# Altium PCB gripper_control.PcbDoc
Units mm, origin at the board's own origin, x right, y up, seen from the top; angles counter-clockwise.
Board outline 58 x 55.88 mm, 2 copper layers (Top Layer, Bottom Layer), stack 1.58 mm thick; 23 components, 15 nets, 89 pads, 14 vias.
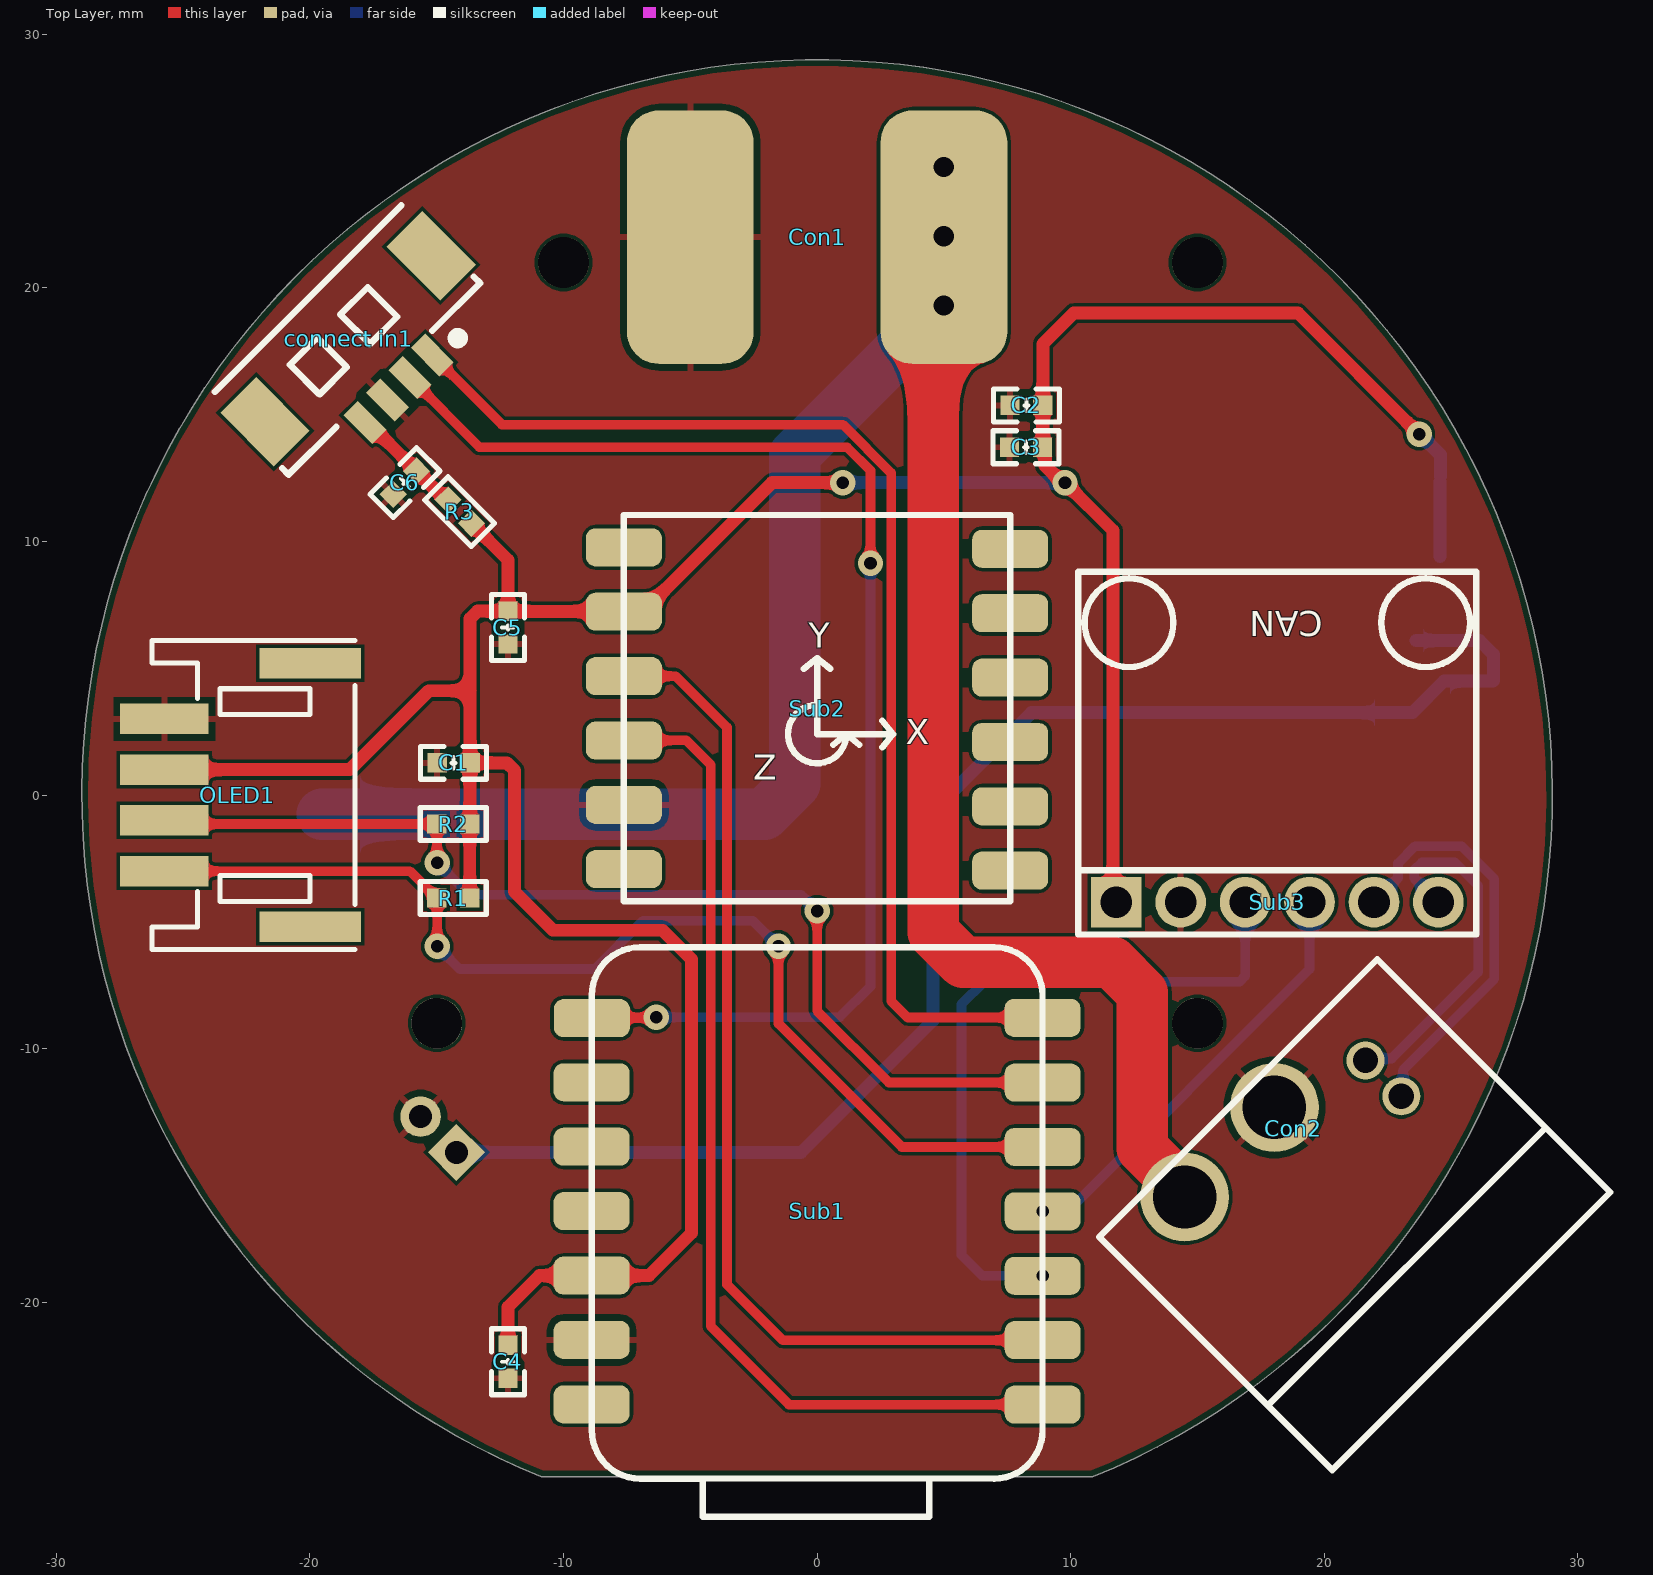
[diagram p0: Top Layer view]
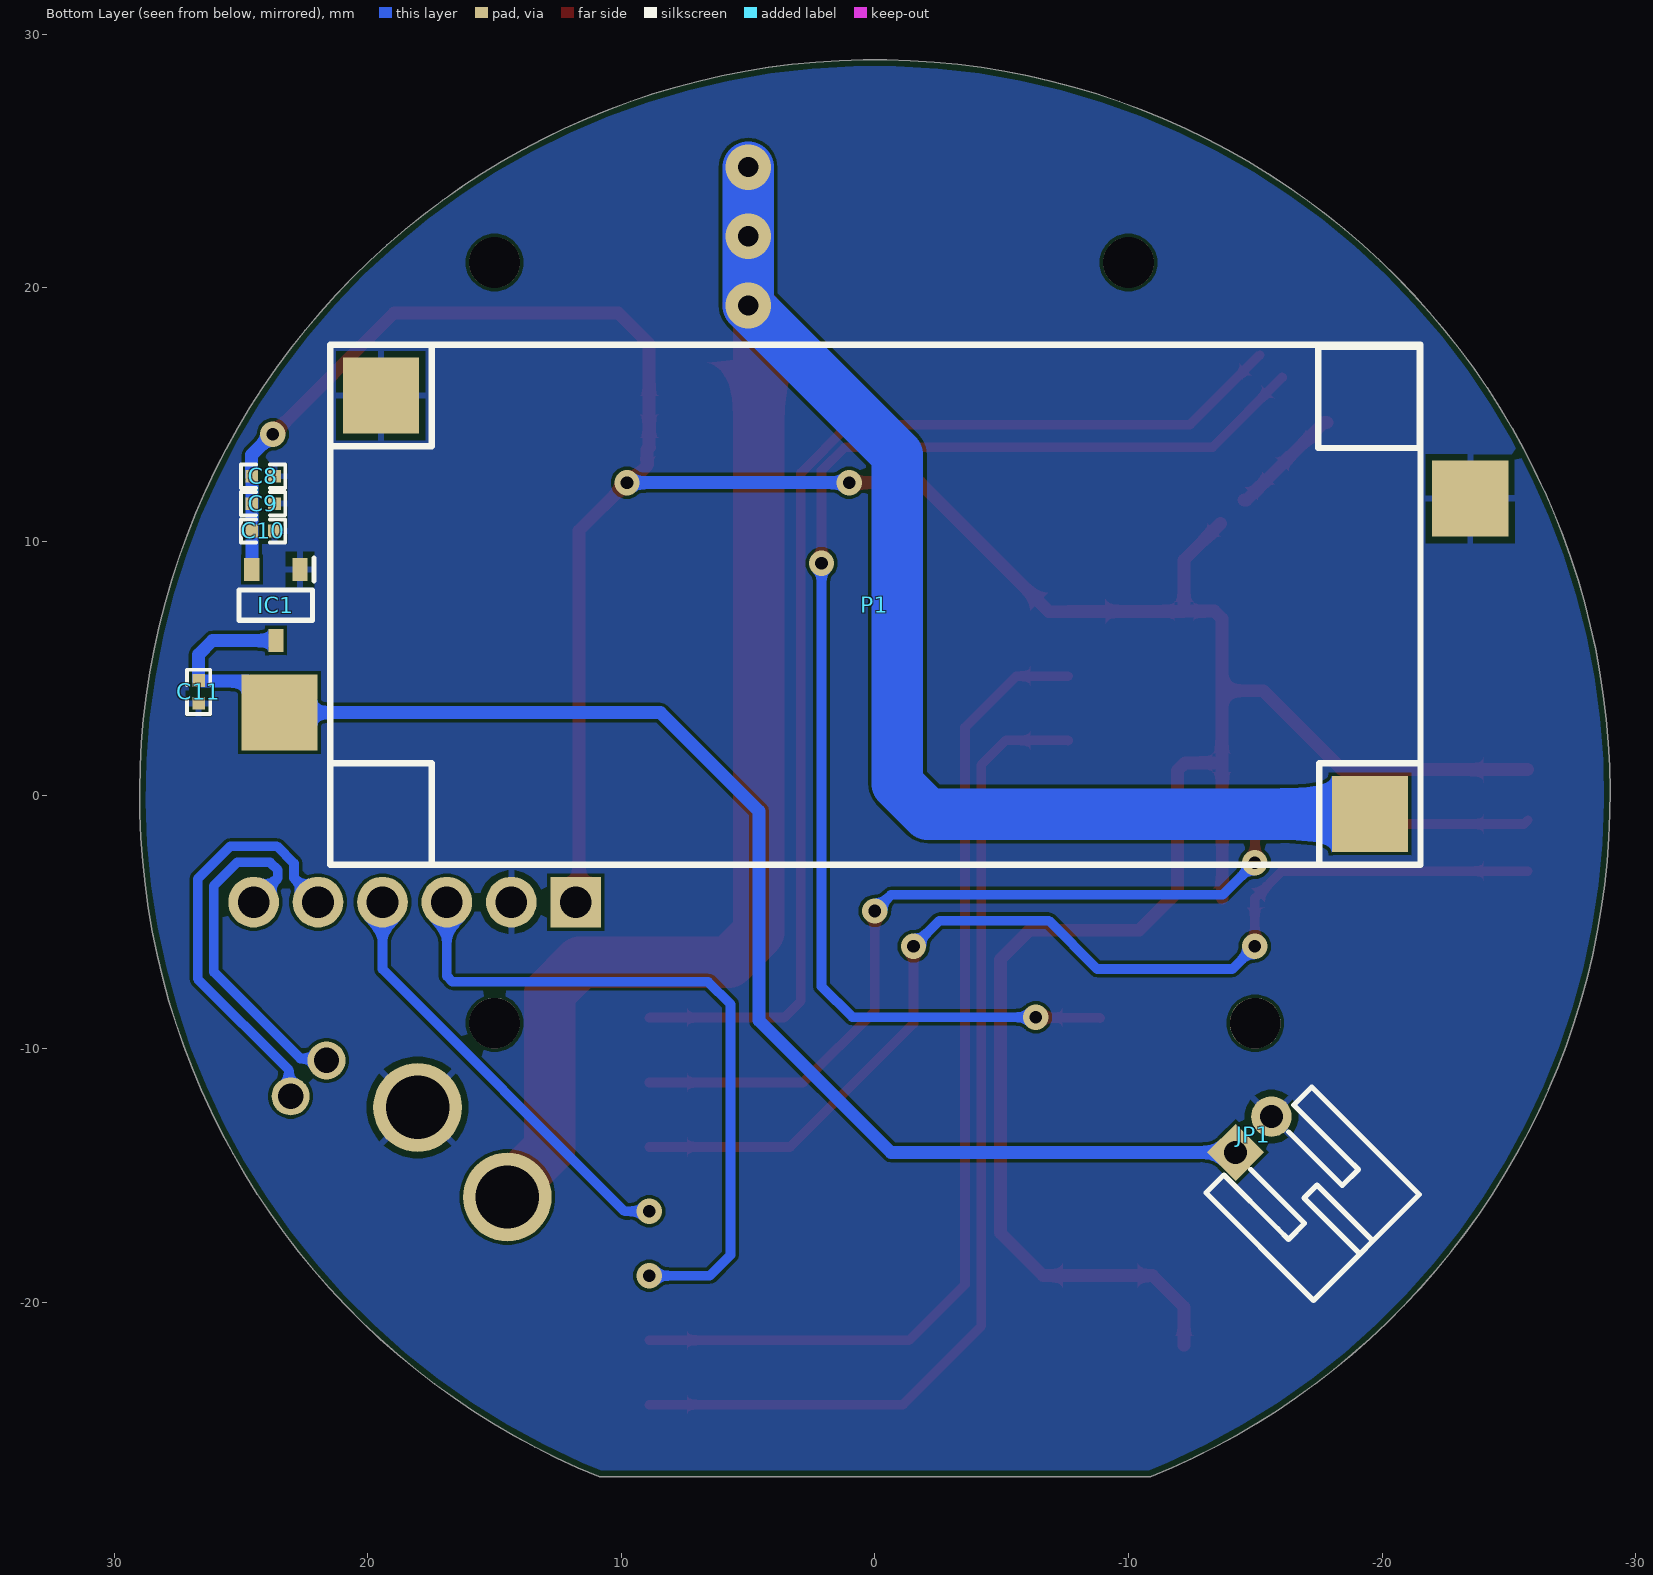
[diagram p1: Bottom Layer view, seen from below]

## Layer stack, top to bottom
Top Solder: solder mask 0.0102, Solder Resist, Dk 3.5
Top Layer: signal copper 0.0356
Dielectric 1: dielectric 1.5086, FR-4, Dk 4.8
Bottom Layer: signal copper 0.0356
Bottom Solder: solder mask 0.0102, Solder Resist, Dk 3.5

## Board outline
-10.864,-26.888 cw(c0,0) 10.864,-26.888

## Design rules (kind name [scope] priority, off if disabled: settings)
BoardOutlineClearance [All] p1: gap=0.254 ignorepadtopadclearanceinfootprint=FALSE except(0: Arc-SplitContinuation Track-SplitContinuation SMDPad-SplitContinuation THPad-SplitContinuation Via-SplitContinuation Fill-SplitContinuation Poly-SplitContinuation Region-SplitContinuation Text-SplitContinuation)
Clearance [All] p1: gap=0.127 ignorepadtopadclearanceinfootprint=FALSE
PolygonConnect [All] p1: connectstyle=Relief reliefconductorwidth=0.254 reliefentries=4 polygonreliefangle="90 Angle" airgapwidth=0.254
RoutingVias RoutingVias_1 [All] p1: holewidth=0.711 width=1.27 viastyle="Through Hole" minholewidth=0.1 minwidth=0.1 maxholewidth=5 maxwidth=5
RoutingVias [All] p2: holewidth=0.711 width=1.27 viastyle="Through Hole" minholewidth=0.711 minwidth=1.27 maxholewidth=0.711 maxwidth=1.27
SolderMaskExpansion [All] p1: expansion=0.102 istentingtop=FALSE
SupplyNets "Schematic Supply Nets_3" [InNet('5v')] p1: voltage=0.000
SupplyNets "Schematic Supply Nets_2" [InNet('GND')] p2: voltage=0.000
SupplyNets "Schematic Supply Nets_1" [InNet('24v')] p3: voltage=0.000
SupplyNets "Schematic Supply Nets" [InNet('3v3')] p4: voltage=0.000
Width [All] p1: maxlimit=2.032 minlimit=0.254 preferedwidth=0.254 minimp=50.000000 maximp=50.000000 favimp=50.000000
30 further rules are at their usual default settings.

## Components (designator, comment, footprint, x,y, rotation, side; value= is the part's Value field where it differs from the comment)
C1 "0.1uf" "C 0603_L" -14.336,1.27 r0 top
C2 "0.1uf" "C 0603_L" 8.255,15.367 r0 top
C3 "1uF" "C 0603_L" 8.24,13.716 r0 top
C4 "10uf" "C 0603_L" -12.192,-22.352 r90 top
C5 "0.1uf" "C 0603_L" -12.192,6.604 r90 top
C6 "0.1uf" "C 0603_L" -16.256,12.319 r45 top
C8 "1uF" C0402_L 24.13,12.573 r180 bottom
C9 "10uF" C0402_L 24.13,11.493 r180 bottom
C10 "100nF" C0402_L 24.13,10.414 r180 bottom
C11 "1uF" C0402_L 26.67,4.064 r270 bottom
Con1 "24v_input_pad" "high volt input" 0,22 r90 top
Con2 "xt30_2_2" xt30_2_2 20.318,-26.624 r135 top
"connect in1" "HDR-1X4" "MX 1.25-WS-4P" -18.5,18 r225 top
IC1 "ME6211A33M3G-N" SOT95P280X145-3N 23.622,7.493 r270 bottom
JP1 "HDR-1X2" PH2.0-WI-2P -14.931,-13.39 r135 bottom
OLED1 "HDR-1X4" PH2.0-WS-4P -20,0 r90 top
P1 "DC_module" xibang_24v_dc 0,7.5 r270 bottom
R1 "4.7k" "R 0603_L" -14.351,-4.064 r0 top
R2 "4.7k" "R 0603_L" -14.351,-1.143 r0 top
R3 "0(NC)" "R 0603_L" -14.097,11.176 r315 top
Sub1 "esp32_c6_xiao" esp32_c6_xiao -8.89,-6 r270 top
Sub2 "JY901x" JY901x -7.62,-4.196 r0 top
Sub3 "can_twai" 6pin_2.5_can 26,-5.5 r90 top

## Footprints (in the part's own frame and the unit in brackets; to place one, negate y for a bottom-side part, rotate by r counter-clockwise, add the part's x,y. Pads: shape width x height; smd on the part's side, far side on the other; paste and mask are expansions set on the pad)
6pin_2.5_can [mm]
  rect 2x2 hole 1.25: 0(1.275,14.2)
  round 2 hole 1.25: 1(1.275,11.66) 2(1.275,9.12) 3(1.275,6.58) 4(1.275,4.04) 5(1.275,1.5)
  silkscreen extent 0,0 14.3,15.7
C0402_L [mm] "ÌùÆ¬MLCCµçÈÝ"
  rect 0.5x0.5 smd: 1(-0.45,0) 2(0.45,0)
  silkscreen extent -0.87,-0.46 0.88,0.46, body extent -0.5,-0.25 0.5,0.25, height 0.5
"C 0603_L" [mil] "ÎÞ¼«ÐÔÌùÆ¬µçÈÝ"
  rect 30x30 smd: 1(-25.59,0) 2(25.59,0)
  silkscreen extent -51,-26 51,26, body extent -31,-16 31,16, height 32
esp32_c6_xiao [mm]
  rrect50% 1.5x3 smd: 0(18.04,17.787) 1(15.5,17.787) 2(12.96,17.787) 3(10.42,17.787) 4(7.88,17.787) 5(5.34,17.787) 6(2.79,17.78) 7(2.8,0.007) 8(5.33,0) 9(7.87,0) 10(10.41,0) 11(12.95,0) 12(15.49,0) 13(18.03,0)
  silkscreen extent 0,0 22.46,17.78
"high volt input" [mm]
  rrect50% 10x5 smd: 0(0,-5) 1(0,5)
JY901x [mm]
  rrect50% 3x1.5 smd: 0(0,13.965) 1(0,11.425) 2(0,8.885) 3(0,6.345) 4(0,3.805) 5(0,1.275) 6(15.235,1.217) 7(15.235,3.747) 8(15.235,6.287) 9(15.235,8.827) 10(15.235,11.367) 11(15.235,13.907)
  silkscreen extent 0,0 15.24,15.24
"MX 1.25-WS-4P" [mm] "³¤£º10.15mm£¬¿í£º4.2mm£¬¸ß£º3.4mm"
  rect 2x3 smd: 0(-4.632,0) 0(4.632,0)
  rect 0.8x1.6 smd: 1(-1.889,2.811) 2(-0.639,2.811) 3(0.611,2.811) 4(1.861,2.811)
  silkscreen extent -5.23,-2.23 5.45,3.25, body extent -5.07,-2.1 5.07,3.09, height 3.4
PH2.0-WI-2P [mm] "³¤£º5.9mm£¬¿í£º6mm£¬¸ß£º4.7mm"
  rect 1.6x1.6 hole 0.9: 1(-1,0)
  round 1.6 hole 0.9: 2(1,0)
  silkscreen extent -2.95,-6.3 2.95,-0.3, body extent -2.95,-6.3 2.95,0.3, height 4.75
PH2.0-WS-4P [mm] "³¤£º12mm£¬¿í£º7.6mm£¬¸ß£º5.5mm"
  rect 1.2x4 smd: 0(-5.2,-0.006) 0(5.2,-0.006)
  rect 1.2x3.5 smd: 1(-3,5.744) 2(-1,5.744) 3(1,5.744) 4(3,5.744)
  silkscreen extent -6.1,-1.78 6.1,6.22, body extent -6,-1.65 6,6.95, height 5.55
"R 0603_L" [mil] "1/10WÌùÆ¬µç×è"
  rect 30x30 smd: 1(-25.59,0) 2(25.59,0)
  silkscreen extent -51,-26 51,26, body extent -31,-16 32,16, height 16
SOT95P280X145-3N [mm]
  rect 0.9x0.6 smd: 1(-1.4,0.95) 2(-1.4,-0.95) 3(1.4,0)
  silkscreen extent -1.85,-1.45 0.6,1.5, body extent -1.4,-1.45 1.4,1.45, height 1.45
xibang_24v_dc [mm]
  rect 3x3 smd: 0(8.25,19.519) 1(-4.187,23.481) 2(4.25,-23.481) 3(-8.25,-19.481)
  silkscreen extent -10.25,-21.48 10.25,21.52
xt30_2_2 [mm]
  round 3.5 hole 2.5: 0(11.73,-3.5) 1(11.73,-8.5)
  round 1.5 hole 1: 2(10.5,-12.35) 3(8.5,-12.35)
  silkscreen extent 0,-15.5 13,0

## Part data
C1 C2 C3 C4 C5 C6: library part C, "无极性贴片电容", BOM名称=无极性贴片电容, 学习资源=www.ooocke.com, 版权归属=源创客
C8 C9 C10 C11: library part C, "贴片电容/MLCC电容", BOM名称=无极性贴片电容, 当前库版本V2024.2.3 @淘宝卖家:黄晶宝石=最新版本发布https://item.taobao.com/item.htm?id=566775463719, 联系下单店铺卖家 免费帮你查找封装="联系下单店铺卖家 免费技术指导"
"connect in1" OLED1: library part "Header 4", "4P接插件", BOM名称=4P接插件, 学习资源=www.ooocke.com, 版权归属=源创客
IC1: "Integrated Circuit", Manufacturer_Name=Microne, Datasheet Link=https://www.lcsc.com/datasheet/lcsc_datasheet_1811151641_MICRONE-Nanjing-Micro-One-Elec-ME6211A33M3G-N_C168807.pdf, Height=1.45mm, Manufacturer_Part_Number=ME6211A33M3G-N
JP1: library part "Header 2", "2P接插件", BOM名称=2P接插件, 学习资源=www.ooocke.com, 版权归属=源创客
R1 R2 R3: library part R, "贴片电阻", BOM名称=贴片电阻, 学习资源=www.ooocke.com, 版权归属=源创客

## Free pads (board coordinates)
  round 2 hole 2: 0(-15,-9) 0(-10,21) 0(15,-9) 0(15,21)

## Via types
v1: diameter 1, hole 0.5, Top Layer to Bottom Layer, tented both sides, 11 vias
v2: diameter 1.8, hole 0.8, Top Layer to Bottom Layer, tented both sides, 3 vias

## Nets (pads, with @x,y where several pads share a name; then routed paths per layer and width w, separated by ;. In a path a pad name is that pad's centre, name@x,y a point inside that pad or via, vN(x,y) a via of type N, cw(c..) or ccw(c..) an arc to the next point about the centre after c; other vN are vias at no path point)
3v3: C1.2 C2.2 C3.2 C4.2 C5.2 C8.1 C9.1 C10.1 IC1.2 OLED1.3 R1.2 R2.2 R3.2 Sub1.11 Sub2.1 Sub3.0 | length 135.2
  Top Layer w0.508: OLED1.3 -18.431,1 -15.318,4.113 -13.686,4.113 ; R1.2 -13.701,-1.151 -13.694,-1.143 -13.694,1.262 C1.2 ; R3.2 -12.192,9.271 C5.2 ; C4.2 -12.192,-20.193 -10.949,-18.95 Sub1.11 -6.631,-18.95 -4.953,-17.272 -4.953,-6.477 -6.096,-5.334 -10.414,-5.334 -11.938,-3.81 -11.938,0.972 -12.236,1.27 C1.2 ; v1(1.016,12.319) -1.78,12.319 -6.87,7.229 Sub2.1 -7.632,7.242 -12.18,7.242 C5.2 ; C3.2 C3.2@8.905,13.701 ; v1@9.716,12.255 8.984,12.987 8.984,13.622 C3.2@8.905,13.701 ; v1(9.779,12.319) 11.669,10.429 11.669,-4.094 Sub3.0 ; v1(23.742,14.231) 18.963,19.01 10.12,19.01 8.905,17.795 C2.2 C3.2@8.905,13.701 ; C1.2 -13.686,4.113 ; -13.686,4.113 -13.686,6.956 -13.388,7.254 C5.2
  Bottom Layer w0.508: v1(1.016,12.319) v1(9.779,12.319) ; v1@23.749,14.25 24.58,13.419 C8.1 ; 24.572,9.401 C8.1@24.572,12.356
5v: C11.1 IC1.3 JP1.1 P1.2 | length 57.7
  Bottom Layer w0.508: JP1.1 -0.635,-14.097 4.572,-8.89 4.572,-0.635 8.457,3.25 P1.2 24.727,4.496 26.652,4.496 C11.1 26.67,5.544 26.121,6.093 IC1.3
24v: Con1.0 Con2.0 P1.0 | length 89.1
  Top Layer w2.032: v2(5,19.304) 4.572,18.876 4.572,-5.414 5.762,-6.604 11.637,-6.604 12.827,-7.794 12.827,-13.93 14.645,-15.748 Con2.0@14.986,-15.748
  Bottom Layer w2.032: P1.0 -2.079,-0.75 -0.889,0.44 -0.889,13.415 v2(5,19.304) v2(5,22.034) v2(5,24.765)
CAN_H: Con2.3 Sub3.4 | length 16.6
  Bottom Layer w0.381: Sub3.4 Sub3.4 22.913,-3.271 22.913,-2.692 23.586,-2.018 25.414,-2.018 26.707,-3.311 26.707,-7.249 23.111,-10.845 23.111,-11.81 Con2.3
CAN_L: Con2.2 Sub3.5 | length 14
  Bottom Layer w0.381: Con2.2 21.697,-10.396 22.662,-10.396 26.072,-6.986 26.072,-3.574 25.151,-2.653 23.849,-2.653 23.548,-2.955 23.548,-3.271 Sub3.5 Sub3.5
GND: "connect in1.3" C1.1 C2.1 C3.1 C4.1 C5.1 C6.1 C8.2 C9.2 C10.2 C11.2 Con1.1 Con2.1 IC1.1 JP1.2 OLED1.4 P1.1 P1.3 Sub1.12 Sub2.4 Sub3.1
NetC6_2: "connect in1.4" C6.2 R3.1 | length 4.5
  Top Layer w0.508: -17.829,14.697 -17.714,14.697 -14.653,11.636 R3.1
SCL: OLED1.2 R2.1 Sub1.5 | length 42.1
  Top Layer w0.381: OLED1.2 -25.601,-1.143 R2.1 -14.994,-1.151 -14.994,-2.659 v1(-14.986,-2.667) ; v1(0,-4.572) 0,-8.509 2.831,-11.34 Sub1.5
  Bottom Layer w0.381: v1(-14.986,-2.667) -13.716,-3.937 -0.635,-3.937 v1(0,-4.572)
SDA: OLED1.1 R1.1 Sub1.4 | length 43.6
  Top Layer w0.381: OLED1.1 -16.065,-3 R1.1 ; v1(-14.986,-5.969) R1.1@-14.986,-4.079 ; v1(-1.524,-5.969) -1.524,-9.017 3.339,-13.88 Sub1.4
  Bottom Layer w0.381: v1(-14.986,-5.969) -14.097,-6.858 -8.763,-6.858 -6.858,-4.953 -2.54,-4.953 v1(-1.524,-5.969)
TWAI_RX: Sub1.3 Sub3.3 | length 16.6
  Bottom Layer w0.381: v1(8.897,-16.42) 9.869,-16.42 19.42,-6.869 Sub3.3@19.42,-4.725
TWAI_TX: Sub1.2 Sub3.2 | length 28
  Bottom Layer w0.381: v1(8.897,-18.96) 6.514,-18.96 5.693,-18.139 5.693,-8.246 6.573,-7.366 16.657,-7.366 16.88,-7.143 Sub3.2
UART1_rx: "connect in1.2" Sub1.7 | length 51.5
  Top Layer w0.381: -16.061,16.464 -13.313,13.716 1.187,13.716 2.103,12.799 v1(2.103,9.144) ; Sub1.7 -8.864,-8.781 -6.368,-8.781 v1(-6.35,-8.763)
  Bottom Layer w0.381: v1(-6.35,-8.763) 0.889,-8.763 2.103,-7.549 v1(2.103,9.144)
UART1_tx: "connect in1.1" Sub1.6 | length 47.1
  Top Layer w0.381: -15.177,17.348 -12.434,14.605 1.016,14.605 2.921,12.7 2.921,-8.128 3.57,-8.777 8.876,-8.777 Sub1.6
UART2_rx: Sub1.0 Sub2.3 | length 40.3
  Top Layer w0.381: Sub2.3 -7.615,2.154 -5.158,2.154 -4.191,1.187 -4.191,-20.955 -1.106,-24.04 Sub1.0
UART2_tx: Sub1.1 Sub2.2 | length 40.2
  Top Layer w0.381: Sub2.2 -5.578,4.689 -3.556,2.667 -3.556,-19.304 -1.36,-21.5 Sub1.1
pads on no net: "connect in1.0" OLED1.0 Sub1.8 Sub1.9 Sub1.10 Sub1.13 Sub2.0 Sub2.5 Sub2.6 Sub2.7 Sub2.8 Sub2.9 Sub2.10 Sub2.11

## Polygon pours and split planes (outlines as drawn)
GND on Top Layer "GND_L01_P001" (solid, remove dead copper, pour order 1): -35.034,31.124 -32.748,33.41 33.165,33.41 33.165,-29.582 29.482,-33.265 -37.066,-33.265
GND on Bottom Layer "GND_L02_P000" (solid, remove dead copper, pour order 0): -34.925,30.988 -32.639,33.274 33.274,33.274 33.274,-29.718 29.591,-33.401 -36.957,-33.401

## Silkscreen, mask and mechanical layers (free items; w line width, h text height)
Mechanical 1:
  the board outline again, w0.254

## Text inside footprints (layer, text, board x,y; h text height)
Sub2: Top Overlay "Z" at -2.52,0.604 h1; Top Overlay "X" at 3.505,2.004 h1; Top Overlay "Y" at -0.32,5.804 h1
Sub3: Top Overlay "CAN" at 19.95,7.25 h1 r180